# Altium PCB Audio-Player-v1.1.PcbDoc (part 3 of 3)
Units mil, origin at the board's own origin, x right, y up, seen from the top; angles counter-clockwise.
Board outline 4527.56 x 1574.8 mil, 4 copper layers (Top Layer, Ground, Power, Bottom Layer), stack 62.449 mil thick; 107 components, 72 nets, 372 pads, 147 vias.
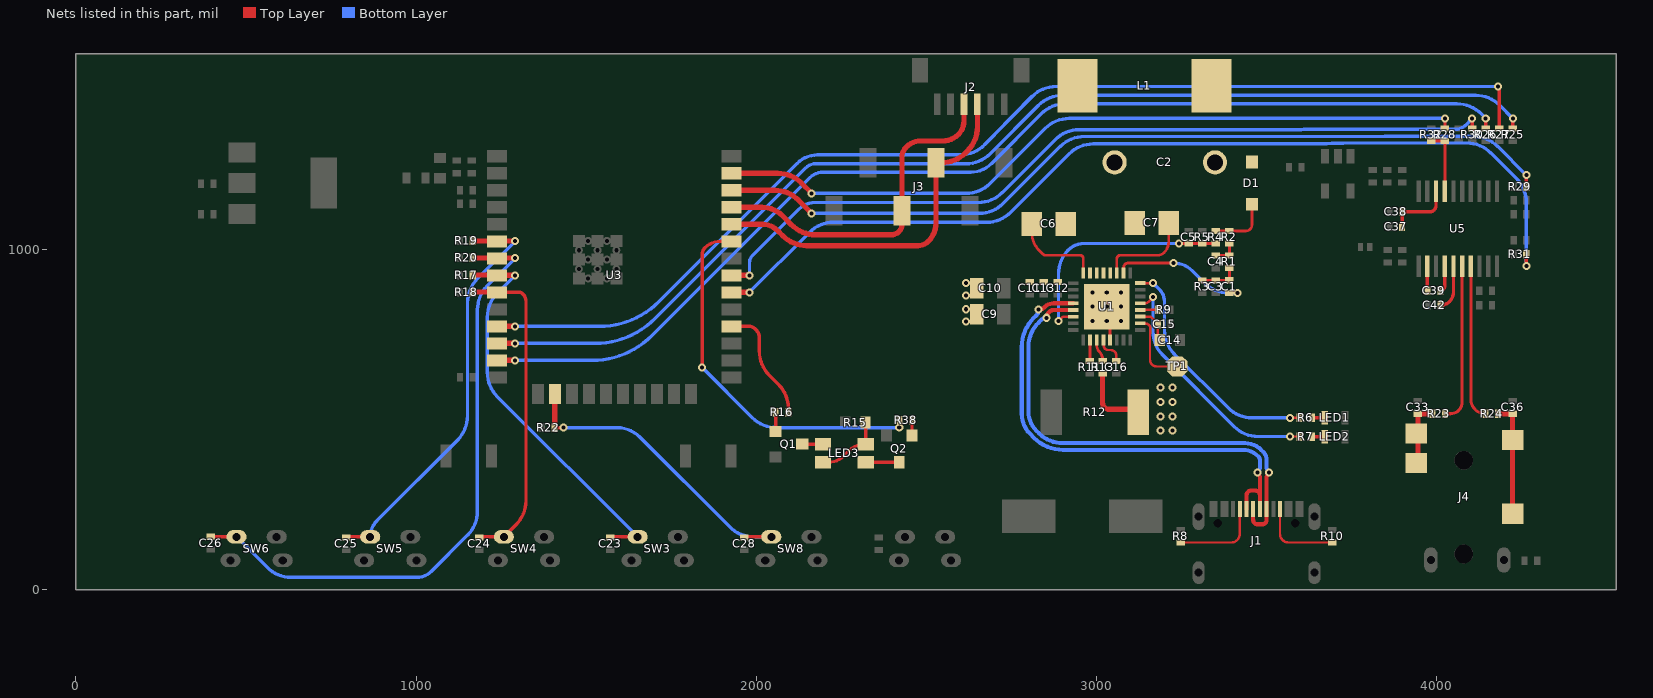
[diagram p4: the nets of this part, all layers, seen from the top]

## Via types
v1: diameter 23.62, hole 11.81, Top Layer to Bottom Layer, tented both sides, 147 vias

## Nets (pads, with @x,y where several pads share a name; then routed paths per layer and width w, separated by ;. In a path a pad name is that pad's centre, name@x,y a point inside that pad or via, vN(x,y) a via of type N, cw(c..) or ccw(c..) an arc to the next point about the centre after c; other vN are vias at no path point) (continued)
IO13: C28.2 R22.1 SW8.1 U3.16 | length 937.3
  Top Layer w10: R22.1@1407.8,478.67 ccw(c1414.24,485.11) 1414.24,476 v1(1434,476) ; C28.2@1965.13,153.5 cw(c1969.14,149.5) 1969.14,155.16 SW8.1@2044.17,155.16
  Top Layer w15.33: R22.1@1407.8,478.67 U3.16@1407.8,574.79
  Bottom Layer w10: v1(1434,476) 1591.41,476 cw(c1591.41,382.83) 1657.29,448.71 1921.55,184.45 ccw(c1992.26,255.16) 1992.26,155.16 SW8.1@2044.17,155.16
IO14: R26.2 U3.13 | length 3240
  Top Layer w10: R26.2@4144.36,1356 v1(4144.36,1385)
  Top Layer w15.33: U3.13@1238.11,674 v1(1291,674)
  Bottom Layer w10: v1(1291,674) 1518.11,674 ccw(c1518.11,920.64) 1692.51,746.24 2156.69,1210.42 cw(c2196.72,1170.38) 2196.72,1227 2630,1227 ccw(c2630,1313.91) 2691.46,1252.46 2837.71,1398.71 cw(c2908.42,1328) 2908.42,1428 4059.94,1428 cw(c4059.94,1328) 4130.65,1398.71 v1(4144.36,1385)
IO17: R16.1 U3.28 | length 347.5
  Top Layer w10: U3.28@1927.09,774 1979.68,774 cw(c1979.68,752.34) 1995,767.66 2000.76,761.9 cw(c1980.86,742) 2009,742 2009,701.29 ccw(c2109,701.29) 2038.29,630.58 2064.71,604.16 cw(c1994,533.45) 2094,533.45 R16.1@2094,521
IO18: R31.2 U3.30 | length 2814.7
  Top Layer w10: v1(4263.55,951) R31.2@4263.55,986.17
  Top Layer w15.33: U3.30@1927.09,874 v1(1979.98,874)
  Bottom Layer w10: v1(1979.98,874) 2156.69,1050.71 cw(c2227.4,980) 2227.4,1080 2677.43,1080 ccw(c2677.43,1180) 2748.14,1109.29 2919.91,1281.05 cw(c2990.32,1210.64) 2990.32,1310.22 3677.57,1310.22 cw(c3697.69,1212.26) 3691.28,1312.06 3725.31,1312.26 3846.94,1313 ccw(c3846.88,1333) 3847.02,1313 4088.58,1313 cw(c4088.58,1213) 4159.29,1283.71 4234.26,1208.74 cw(c4163.55,1138.03) 4263.55,1138.03 v1(4263.55,951)
IO19: R30.2 U3.31 | length 2411.4
  Top Layer w10: R30.2@4104.41,1356 v1(4104.41,1385)
  Top Layer w15.33: U3.31@1927.09,924 v1(1979.98,924)
  Bottom Layer w10: v1(1979.98,924) 1979.98,961.56 cw(c2007.55,961.56) 1988.05,981.05 2125.48,1118.48 cw(c2172.37,1071.6) 2172.37,1137.9 2652.48,1137.9 ccw(c2652.48,1237.9) 2723.19,1167.19 2878.83,1322.83 cw(c2949.54,1252.12) 2949.54,1352.12 3601.97,1352.12 cw(c3615.24,1253) 3615.24,1353 4056.64,1353 ccw(c4056.64,1391.05) 4083.55,1364.14 v1(4104.41,1385)
IO21: R38.1 U3.33 | length 1107.9
  Top Layer w10: v1(1841,653) 1841,985.69 cw(c1868.31,985.69) 1849,1005 cw(c1894.87,959.13) 1894.87,1024 U3.33@1927.09,1024 ; v1(2420.33,476.27) 2420.33,498.35 R38.1@2420.63,498.35
  Bottom Layer w10: v1(1841,653) 1988.44,505.56 ccw(c2059.15,576.27) 2059.15,476.27 v1(2420.33,476.27)
IO22: R29.2 U3.36 | length 2521.5
  Top Layer w10: R29.2@4263.55,1185 v1(4263.55,1218.23)
  Top Layer w15.33: U3.36@1927.09,1174 2053.58,1174 cw(c2053.58,1074) 2124.29,1144.71 v1(2163,1106)
  Bottom Layer w10: v1(2163,1106) 2655.58,1106 ccw(c2655.58,1206) 2726.29,1135.29 2893.81,1302.81 cw(c2964.52,1232.1) 2964.52,1332.1 3697.69,1332.1 3846.88,1333 cw(c3847,1313) 3847,1333 4088.58,1333 cw(c4088.58,1213) 4096.24,1332.76 4107.72,1332.02 ccw(c4108.36,1342) 4108.36,1332 cw(c4108.36,1232) 4179.07,1302.71 v1(4263.55,1218.23)
IO23: R28.2 U3.37 | length 2229.1
  Top Layer w10: R28.2@4024.5,1356 v1(4024.5,1385)
  Top Layer w15.33: U3.37@1927.09,1224 2062.58,1224 cw(c2062.58,1124) 2133.29,1194.71 v1(2163,1165)
  Bottom Layer w10: v1(2163,1165) 2616.99,1165 ccw(c2616.99,1265) 2687.7,1194.29 2849.2,1355.78 cw(c2919.91,1285.07) 2919.91,1385.07 4022.89,1385.07 cw(c4022.89,1366.57) v1@4024.5,1385
IO26: R27.2 U3.11 | length 3337.3
  Top Layer w10: v1(4181,1479) 4184.31,1475.69 R27.2@4184.31,1356
  Top Layer w15.33: U3.11@1238.11,774 v1(1291,774)
  Bottom Layer w10: v1(1291,774) 1539.21,774 ccw(c1539.21,1020.64) 1713.61,846.24 2121.12,1253.76 cw(c2179.65,1195.23) 2179.65,1278 2600.15,1278 ccw(c2600.15,1378) 2622.09,1280.44 ccw(c2600.15,1378) 2670.86,1307.29 2701.48,1337.91 ccw(c2687.29,1352) 2701.6,1338.02 2810.61,1449.61 cw(c2817.76,1442.62) 2810.73,1449.73 cw(c2881.42,1379) 2881.42,1479 v1(4181,1479)
IO27: R25.2 U3.12 | length 3319.8
  Top Layer w10: R25.2@4224.26,1356 v1(4224.26,1385)
  Top Layer w15.33: U3.12@1238.11,724 v1(1291,724)
  Bottom Layer w10: v1(1291,724) 1527.11,724 ccw(c1527.11,970.64) 1701.51,796.24 2144.11,1238.84 cw(c2175.88,1207.06) 2175.88,1252 2616.58,1252 ccw(c2616.58,1352) 2687.29,1281.29 2829.71,1423.71 cw(c2900.42,1353) 2900.42,1453 4114.84,1453 cw(c4114.84,1353) 4185.55,1423.71 v1(4224.26,1385)
IO32: C23.2 R17.1 SW3.1 U3.8 | length 1182.9
  Top Layer w10: C23.2@1570.17,153.5 cw(c1574.17,149.5) 1574.17,155.16 SW3.1@1651.17,155.16
  Top Layer w15.33: R17.1@1166.43,924.5 U3.8@1238.11,924.5 ; U3.8@1238.11,924 v1(1291,924)
  Bottom Layer w10: v1(1291,924) 1238.87,871.87 ccw(c1309.58,801.16) 1209.58,801.16 1209.58,638.17 ccw(c1309.58,638.17) 1238.87,567.46 SW3.1@1651.17,155.16
IO33: C24.2 R18.1 SW4.1 U3.9 | length 957
  Top Layer w10: C24.2@1189.04,155.16 SW4.1@1258.17,155.16 1293.71,190.7 ccw(c1223,261.41) 1323,261.41 1323,847.27 ccw(c1292.27,847.27) 1314,869 ccw(c1300.72,855.72) 1300.72,874.5 U3.9@1238.11,874.5
  Top Layer w15.33: R18.1@1166.43,874.5 U3.9@1238.11,874.5
IO34: C25.2 R19.1 SW5.1 U3.6 | length 1230.4
  Top Layer w10: C25.2@794,153.5 cw(c798,149.5) 798,155.16 SW5.1@865.17,155.16
  Top Layer w15.33: R19.1@1166.43,1024.5 v1(1291,1024.5)
  Bottom Layer w10: SW5.1@865.17,155.16 cw(c932.81,155.16) 884.98,202.98 1121.71,439.71 ccw(c1051,510.42) 1151,510.42 1151,843.08 cw(c1251,843.08) 1180.29,913.79 v1(1291,1024.5)
IO35: C26.2 R20.1 SW6.1 U3.7 | length 1836.8
  Top Layer w10: C26.2@397.07,153.5 cw(c401.07,149.5) 401.07,155.16 SW6.1@472.17,155.16
  Top Layer w15.33: R20.1@1166.43,974.5 v1(1291,974.5)
  Bottom Layer w10: SW6.1@472.17,155.16 562.04,65.29 ccw(c632.75,136) 632.75,36 1001.12,36 ccw(c1001.12,99.87) 1046.25,54.67 ; 1046.28,54.71 1151,159.42 ccw(c1080.29,230.13) 1180.29,230.13 1180.29,822.37 cw(c1280.29,822.37) 1209.58,893.08 v1(1291,974.5)
MUTE: R28.1 R32.2 U5.17 | length 188.1
  Top Layer w10: R32.2@3984.55,1319 R28.1@4024.5,1319 4024.5,1171.47 U5.17@4023.87,1171.47
NetC1_2: C1.2 C3.2 R1.1 R3.2 | length 115.6
  Top Layer w8: R3.2@3311.4,909 3311.4,909.5 C1.2@3391,909.5 R1.1@3391,944.95
NetC2_1: C2.1 D1.1 L1.2
NetC2_2: C2.2 C7.2 U1.20 U1.21
NetC4_2: C4.2 R1.2 R2.1 | length 75.4
  Top Layer w8: C4.2@3351.2,981.8 3351.2,981.95 R1.2@3391,981.95 R2.1@3391,1017.4
NetC6_1: C6.1 U1.24 | length 270.8
  Top Layer w8: C6.1@2809.51,1074.9 2809.51,1052.56 ccw(c2890.91,1052.56) 2833.35,995 2841.1,987.26 ccw(c2851.37,997.53) 2851.37,983 2951.37,983 cw(c2951.37,972.9) 2961.47,972.9 U1.24@2961.47,930.44 ; C6.1@2830.06,1072.46 cw(c2832.51,1072.46) C6.1@2832.51,1074.9
NetC6_2: C6.2 L1.1 U1.22 U1.23
NetC7_1: C7.1 U1.19 | length 280.1
  Top Layer w8: U1.19@3059.9,930.44 3059.9,972.9 cw(c3070,972.9) 3070,983 3180.17,983 ccw(c3180.17,1009.63) 3199,990.8 ccw(c3166.89,1022.91) 3212.3,1022.91 C7.1@3212.3,1077.9
NetC14_1: C14.1 C15.1 U1.11 | length 110.9
  Top Layer w7: U1.11@3128.73,802.57 3154.38,802.57 cw(c3154.38,790.38) 3162.07,799.84 ccw(c3171.5,809.5) 3162.93,799.07 cw(c3154.38,790.38) 3163,799 3179.44,782.56 cw(c3176.88,780) C15.1@3180.5,780 3180.5,739.1 ccw(c3186,739.1) C14.1@3186,733.6
NetC16_2: C16.2 U1.4 | length 85.6
  Top Layer w7: U1.4@3020.41,733.6 3020.41,728.74 ccw(c3049.74,728.74) 3021.09,722.47 3021.09,717.85 ccw(c3034.59,717.85) 3027.93,706.11 ccw(c3034.59,717.85) 3034.59,704.35 3042,704.35 cw(c3042,687.66) 3053.81,699.46 cw(c3043.68,689.34) 3058,689.34 C16.2@3058,672.5
NetC37_2: C37.2 C38.2 U5.18 | length 196.5
  Top Layer w10: C37.2@3898.55,1066.37 C38.2@3898.55,1110.38 3978.99,1110.38 ccw(c3978.99,1129.67) 3998.28,1129.67 U5.18@3998.28,1171.47
NetC39_1: C39.1 U5.2 | length 72.5
  Top Layer w10: U5.2@3972.69,951 3972.69,879.79 ccw(c3973.48,879.79) C39.1@3973.48,879
NetC39_2: C39.2 U5.4 | length 79.6
  Top Layer w10: C39.2@4010.48,879 ccw(c4010.48,892.39) 4023.87,892.39 U5.4@4023.87,951
NetC42_1: C42.1 U5.5 | length 136.7
  Top Layer w10: C42.1@4011.5,836 ccw(c4011.5,873.96) 4049.46,873.96 U5.5@4049.46,951
NetD1_2: D1.2 R2.2 R4.2 | length 176.8
  Top Layer w8: R4.2@3351.2,1054.4 R2.2@3391,1054.4 3439.28,1054.4 ccw(c3439.28,1072.12) 3457,1072.12 D1.2@3457,1132.99
NetJ1_A5: J1.A5 R8.1 | length 261.1
  Top Layer w7: R8.1@3247.68,138.5 3395.83,138.5 ccw(c3395.83,164.09) 3421.42,164.09 J1.A5@3421.42,236.81
NetJ1_B5: J1.B5 R10.1 | length 240.5
  Top Layer w7: J1.B5@3539.53,236.81 3539.53,164.09 ccw(c3565.12,164.09) 3565.12,138.5 R10.1@3692.68,138.5
NetLED1_1: LED1.1 R6.2 | length 38
  Top Layer w10: R6.2@3633.5,505 LED1.1@3671.47,505
NetLED2_1: LED2.1 R7.2 | length 38
  Top Layer w10: R7.2@3633.5,449 LED2.1@3671.47,449
NetLED3_1: LED3.1 LED3.3 R15.2 | length 205.7
  Top Layer w10: LED3.1@2195.92,374.55 2212.93,374.55 ccw(c2212.93,435.61) 2256.1,392.43 2269.78,406.11 cw(c2321.9,353.98) LED3.3@2321.9,427.7 cw(c2323.33,429.13) 2321.31,429.13 R15.2@2321.31,491.02
NetLED3_2: LED3.2 Q1.3 | length 60.4
  Top Layer w10: Q1.3@2135.5,427.7 LED3.2@2195.92,427.7
NetLED3_4: LED3.4 Q2.3 | length 98.4
  Top Layer w10: LED3.4@2321.9,374.55 Q2.3@2420.33,374.55
NetQ1_1: Q1.1 R16.2 | length 56.1
  Top Layer w10: Q1.1@2056.76,465.1 2057,465.1 R16.2@2057,521
NetQ2_1: Q2.1 R38.2 | length 45.1
  Top Layer w10: R38.2@2457.63,498.35 2457.73,498.25 Q2.1@2457.73,453.29
NetR6_1: R6.1 U1.16 | length 711.8
  Top Layer w7: U1.16@3128.73,901 3166.05,901 cw(c3166.05,894) v1@3171,898.95 ; v1(3569,505) R6.1@3596.5,505
  Bottom Layer w10: v1(3166.29,901) 3185.65,881.64 cw(c3151.02,847) 3200,847 3200,762.86 ccw(c3300,762.86) 3229.29,692.14 3387.14,534.29 ccw(c3457.86,605) 3457.86,505 v1(3569,505)
NetR7_1: R7.1 U1.13 | length 721.2
  Top Layer w7: U1.13@3128.73,841.94 3142.04,841.94 ccw(c3142.04,859.62) 3149.43,843.56 ccw(c3144.48,856.12) 3154.54,847.12 3163,855.58 3163,859.62 v1(3166.29,859.62) ; v1(3569,450) 3594.09,450 cw(c3594.09,446.59) R7.1@3596.5,449
  Bottom Layer w10: v1(3166.29,859.62) 3166.29,759.13 ccw(c3266.29,759.13) 3195.58,688.42 3404.71,479.29 ccw(c3475.42,550) 3475.42,450 v1(3569,450)
NetR9_1: R9.1 U1.12 | length 52
  Top Layer w7: U1.12@3128.73,822.26 3180.5,822.26 R9.1@3180.5,822
NetR11_2: R11.2 U1.2 | length 63.9
  Top Layer w8: R11.2@2980,672.5 ccw(c2977.49,675.01) R11.2@2981.04,675.01 ; R11.2@2981.04,672.5 U1.2@2981.04,733.6
NetR13_2: R13.2 U1.3 | length 65.7
  Top Layer w8: U1.3@3000.73,733.6 3000.73,718.97 ccw(c3028.97,718.97) 3009,699 cw(c2987.27,677.27) 3018,677.27 R13.2@3018,672.5
NetR23_1: R23.1 U5.6 | length 470.3
  Top Layer w9: R23.1@4024.14,517 4040.9,517 ccw(c4040.9,551.15) 4075.05,551.15 U5.6@4075.05,951
NetR24_1: R24.1 U5.7 | length 458.3
  Top Layer w9: U5.7@4100.64,951 4100.64,559.5 ccw(c4143.14,559.5) R24.1@4143.14,517
NetTP1_1: TP1.1 U1.10 | length 221
  Top Layer w7: U1.10@3128.73,782.89 3140.2,782.89 cw(c3140.2,768.71) 3144.54,782.21 cw(c3144.48,768.71) 3157.98,768.71 3157.98,754.66 ccw(c3171,751.1) 3157.5,751.1 3157.5,675.38 ccw(c3176.88,675.38) 3176.88,656 TP1.1@3237,656
OUTL: C33.2 J4.4 J4.6 R23.2 | length 190.9
  Top Layer w15.33: J4.4@3939.78,372.53 3944.86,377.61 J4.6@3944.86,459.14 ; J4.6@3939.78,459.14 3945,464.36 C33.2@3945,517 R23.2@3987.14,517
OUTR: C36.2 J4.3 J4.5 R24.2 | length 337.1
  Top Layer w15.33: R24.2@4180.14,517 C36.2@4223.14,517 4223.25,516.89 J4.5@4223.25,439.45 J4.3@4223.24,222.92
PGND: C9.1 C10.1 C11.1 C12.1 C13.1 R12.1 R13.1 U1.5 U1.33 | length 313
  Top Layer w8: v1(3030.31,832.02) cw(c3030.31,822.23) 3040.1,822.23 U1.5@3040.1,733.6
  Top Layer w15.33: R13.1@3018,635.5 3018,548.59 ccw(c3036.59,548.59) 3036.59,530 3116.95,530 cw(c3116.95,522) R12.1@3124.95,522
  other v1: 3187.86,467.52 3223.86,467.52 3187.86,509.52 3223.86,509.52 3187.86,551.52 3223.86,551.52 3187.86,593.52 3223.86,593.52 2616.64,788.2 2988.31,790.02 3030.31,790.02 3072.31,790.02 2616.64,824.2 2988.31,832.02 3072.31,832.02 2616.64,865 2988.31,874.02 3030.31,874.02 3072.31,874.02 2616.64,901
RXD0: J2.4 J3.4 U3.34 | length 1086.8
  Top Layer w15.33: U3.34@1927.09,1074 2018.54,1074 cw(c2018.54,1012.54) 2062,1056 2077.71,1040.29 ccw(c2148.42,1111) 2148.42,1011 2474.62,1011 ccw(c2474.62,1055.38) 2506,1024 ccw(c2452.89,1077.11) 2528,1077.11 J3.4@2528,1255 2544.96,1255 ccw(c2544.96,1355) 2615.67,1284.29 2620.7,1289.32 ccw(c2549.99,1360.03) 2649.99,1360.03 J2.4@2649.99,1427.3
TXD0: J2.3 J3.3 U3.35 | length 1031.4
  Top Layer w15.33: U3.35@1927.09,1124 2016.04,1124 cw(c2016.04,1036.78) 2034.23,1122.08 cw(c2016.04,1036.78) 2077.71,1098.45 2103.88,1072.29 ccw(c2174.59,1143) 2174.59,1043 2396.65,1043 ccw(c2396.65,1075.52) 2419.64,1052.52 ccw(c2399.46,1072.71) 2428,1072.71 J3.3@2428,1113.27 2428,1269.62 cw(c2472.38,1269.62) 2441,1301 cw(c2484.46,1257.54) 2484.46,1319 2548.13,1319 ccw(c2548.13,1383.87) 2594,1338 ccw(c2553.89,1378.11) 2610.62,1378.11 J2.3@2610.62,1427.3
USB_D_N: J1.A7 J1.B7 U1.28 | length 1439.1
  Top Layer w12: v1(2830.06,822.95) ccw(c2830.06,846.88) 2846.98,829.95 2847.62,830.58 cw(c2874.74,803.46) 2874.74,841.82 U1.28@2931.89,841.86 U1.28@2931.89,841.86 ; J1.B7@3441.1,236.81 3441.1,277.37 cw(c3454.88,277.37) 3454.88,291.15 3466.69,291.15 ; 3466.74,291.15 cw(c3466.74,277.37) 3480.52,277.37 ; v1(3473.51,344) cw(c3456.58,327.07) 3480.52,327.07 3480.52,277.37 ; J1.A7@3480.47,236.81 3480.52,277.37
  Bottom Layer w12: v1(2830.06,822.95) 2830.06,822.83 cw(c2806.41,822.83) 2823.13,806.1 2815.39,798.36 ccw(c2899.86,713.89) 2780.4,713.89 2780.4,516.15 ccw(c2862.07,516.15) 2804.24,458.48 ccw(c2862.07,516.15) 2804.32,458.4 2816.73,445.99 ccw(c2901.2,530.46) 2816.82,445.9 ccw(c2901.2,530.46) 2901.2,411 3428.86,411 cw(c3428.86,344.08) 3476.18,391.4 cw(c3465.71,380.93) 3480.52,380.93 3480.52,360.93 cw(c3456.58,360.93) v1(3473.51,344)
USB_D_P: J1.A6 J1.B6 U1.29 | length 1430.6
  Top Layer w12: v1(2853.84,799.17) cw(c2877.78,799.17) 2860.85,816.1 2861.42,816.67 cw(c2874.82,803.26) 2874.82,822.22 2931.85,822.22 U1.29@2931.89,822.18 ; J1.A6@3460.79,236.81 3460.79,204.76 ccw(c3473.44,204.76) 3473.44,192.1 3487.39,192.1 ccw(c3487.39,204.87) 3500.16,204.87 J1.B6@3500.16,236.81 ; J1.B6@3500.12,236.81 3500.12,327.07 cw(c3524.05,327.07) v1(3507.13,344)
  Bottom Layer w12: v1(2853.84,799.17) 2853.72,799.17 ccw(c2853.72,775.51) 2836.99,792.24 2829.29,784.54 ccw(c2900,713.83) 2800,713.83 2800,524.27 ccw(c2881.67,524.27) 2823.92,466.52 2830.55,459.89 ccw(c2901.26,530.6) 2831.37,459.08 ccw(c2901.26,530.6) 2901.26,430.6 3436.98,430.6 cw(c3436.98,363.68) 3484.3,411 3490.5,404.8 cw(c3467.28,381.58) 3500.12,381.58 3500.12,360.93 ccw(c3524.05,360.93) v1(3507.13,344)
V_DECODE: C1.1 U1.18 | length 411.3
  Top Layer w8: U1.18@3079.58,930.44 3079.76,930.75 3079.76,946.19 cw(c3093.76,946.19) 3093.76,960.19 v1(3226.5,960.19) ; C1.1@3391,872.5 v1(3414.16,872.5) cw(c3414.16,871.66) v1@3415,871.66
  Bottom Layer w10: v1(3226.5,960.19) cw(c3226.5,882.18) 3281.55,937.45 cw(c3226.5,882.18) 3281.66,937.34 3317.21,901.79 ccw(c3387.92,972.5) 3387.92,872.5 v1(3414.16,872.5)
V_DET: C5.2 R4.1 R5.2 U1.30 | length 707
  Top Layer w7: v1@2885.62,788.32 ccw(c2885.62,792.3) 2888.43,789.48 2898.12,799.17 cw(c2906.13,791.16) 2906.13,802.49 U1.30@2931.89,802.49
  Top Layer w8: v1(3242,1017.4) C5.2@3271.3,1017.4 R5.2@3311.4,1017.4 R4.1@3351.2,1017.4
  Bottom Layer w10: v1(2888.43,789.49) 2888.43,928.01 cw(c2988.43,928.01) 2917.72,998.72 cw(c2962.81,953.63) 2962.81,1017.4 v1(3242,1017.4)
pads on no net: J1.A8 J1.B8 J1.MH J2.MP1 J2.MP2 J4. J4.2 U1.6 U1.7 U1.8 U1.9 U1.14 U1.15 U1.17 U1.25 U1.31 U3.4 U3.5 U3.10 U3.17 U3.18 U3.19 U3.20 U3.21 U3.22 U3.23 U3.24 U3.26 U3.27 U3.29 U3.32 U4.4

## Polygon pours and split planes (outlines as drawn)
GND on Bottom Layer "GND_L04_P007" (solid, remove dead copper, pour order 7): 0,0 4527.56,0 4527.56,1574.8 0,1574.8
PGND on Bottom Layer "PGND_L04_P004" (solid, pour order 4): 2923,446 3235,446 3235,608 3089,608 3089,902 2923,902
AGND on Bottom Layer "AGND_L04_P000" (solid, remove dead copper, pour order 0): 3801,1291 3801,0 4269,0 4269,905 4269,1291
GND on Ground "GND_L02_P010" (solid, pour order 10): 0,0 4527.56,0 4527.56,1574.8 0,1574.8
PGND on Ground "PGND_L02_P002" (solid, pour order 2): 2598,1000 2598,446 3244,446 3244,1000
AGND on Ground "AGND_L02_P003" (solid, remove dead copper, pour order 3): 3801,1291 3801,0 4269,0 4269,905 4269,1291
GND on Power "GND_L03_P009" (solid, remove dead copper, pour order 9): 0,0 4527.56,0 4527.56,1574.8 0,1574.8
5V on Power "5V_L03_P001" (solid, remove dead copper, pour order 1): 659,1223 659,478 2493,478 2493,1223 3662,1223 3663,1224 3663,9.31 0,9.31 0,1223
AGND on Power "AGND_L03_P006" (solid, remove dead copper, pour order 6): 3801,1291 3801,0 4269,0 4269,905 4269,1291
3V3 on Power "3V3_L03_P005" (solid, pour order 5): 0,1574.8 0,1223 659,1223 659,478 2493,478 2493,1223 2700.5,1223 2700.5,1574.8
GND on Top Layer "GND_L01_P008" (solid, remove dead copper, pour order 8): 0,0 4527.56,0 4527.56,1574.8 0,1574.8

## Other copper
Top Layer:
  region net GND: 3584.81,260.43 3584.81,214.46 3608.43,214.46 3608.43,157 3725.18,157 3725.18,260.43
  region net GND: 3356.46,260.43 3356.46,214.46 3332.84,214.46 3332.84,157 3232.39,157 3232.39,260.43
  region net GND: 1175.43,1252 1175.43,1284 1052.82,1284 1052.82,1252
  region net GND: 2947.64,768.63 2916.14,768.63 2916.14,717.85 2966.92,717.85 2966.92,749.35 2947.64,749.35 2947.64,757.61
  pour cut-out: 3091.46,606 3091.46,455.07 2898.54,455.07 2898.54,606 2961.41,606 2961.41,717.85 3030.5,717.85 3030.5,606
  region net 3V3#: 394,1149 539,1149 539,1094 984.31,1094 984.31,1269.82 539,1269.82 539,1245 394,1245
  region net PGND: 2602,1001 2602,768.63 2687.82,768.63 2687.82,1001
  region net 5V: 2705.82,856.04 2705.82,768.63 2775.2,768.63 2775.2,856.04
  region net PGND: 3244,606 3244,455.07 3091.46,455.07 3091.46,606
  pour cut-out: 831,1574.8 831,1319 2339,1319 2339,1574.8
  region net 5V: 3587.04,1334.06 3587.04,1100.85 3651.25,1100.85 3651.25,1334.06
  region net AGND: 3911.05,1224.97 3785.09,1224.97 3785.09,1310 3911.05,1310
  region net AGND: 4268,132.07 4268,35 4168,35 4168,132.36 4267.74,132.36
  region net PGND: 2898.12,895.5 2791.9,895.5 2791.9,932.67 2602,932.67 2602,1001 2804.4,1001 2804.4,959 2898.12,959 2898.12,913.5
  region net NetC6_2: 3006.14,914.69 3006.14,1559.74 2851.37,1559.74 2851.37,995 2975.65,995 2975.65,914.69 3006.35,914.69
  region net 5V: 528.03,1133.99 528.03,1023 394,1023 394,1133.99
  region net 3V3: 1267.64,1206.28 1138.43,1206.28 1138.43,1161.5 1015.8,1161.5 1015.8,1242.72 1267.64,1242.72
  region net NetC2_1: 3278.8,1559.74 3278.8,1192 3540,1192 3540,1559.74
  region net NetC2_2: 3015.23,914.69 3015.23,1373 3170,1373 3170,995 3045.72,995 3045.72,914.69 3015.02,914.69
  region net 5V: 3553.31,213.19 3553.31,377 3667,377 3667,277.37 3576.93,277.37 3576.93,213.19
  region net 5V: 3387.95,213.19 3387.95,377 3036.74,377 3036.74,166.79 3212,166.79 3212,277.37 3364.33,277.37 3364.33,213.19
  region net 5V: 2947.64,856.04 2705.82,856.04 2705.82,919 2775.2,919 2775.2,887.97 2947.64,887.97
  region net 5V: 3735.07,1252.18 3735.07,1307 3688,1307 3688,1252.18 3688,1215.47 3602.5,1215.47 3602.5,1334.06 3768,1334.06 3768,1252.18 3758.69,1252.18
  region net AGND: 3911.05,1242.97 3721.29,1242.97 3721.29,1295.49 3697.67,1295.49 3697.67,1215.47 3911.05,1215.47
  region net AVDD: 3793,1027.25 3793,921 3953.4,921 3953.4,982.5 3833.04,982.5 3833.04,1027.25
  region net 3V3-CODEC: 3953.4,1139.98 3785.09,1139.98 3785.09,995.73 3697.67,995.73 3697.67,1205.97 3953.4,1205.97
  region net FILTER: 4171.11,1202.97 4171.11,1131.5 4235.55,1131.5 4235.55,1202.97
Ground:
  pour cut-out: 831,1574.8 831,1319 2339,1319 2339,1574.8
Power:
  pour cut-out: 831,1574.8 831,1319 2339,1319 2339,1574.8
Bottom Layer:
  pour cut-out: 831,1574.8 831,1319 2339,1319 2339,1574.8

## Silkscreen, mask and mechanical layers (free items; w line width, h text height)
Top Overlay:
  lines w5: 524.55,819.28 524.55,1025.28 ; 524.81,819.28 626.45,819.28 626.45,1025.28 525.65,1025.28 ; 1104.62,847 1104.62,1053 ; 1104.88,847 1190.39,847 ; 1105.72,1053 1191.22,1053 1191.22,847
  text "1" at 1076.92,1024.44 h50
  text "1" at 499.57,996.72 h50
  text "RESET" at 1079.24,297.79 h60
  text "BOOT" at 1793.94,297.79 h60
  text "STOP" at 423.97,226.27 h60
  text "NEXT" at 817,226.26 h60
  text "PREV" at 1210,226.26 h60
  text "PLAY" at 1603,226.26 h60
  text "VOL-" at 1995.97,226.27 h60
  text "VOL+" at 2389,226.26 h60
Board Outline:
  circle w10: c3640.87,767.66 r208
  circle w10: c2262.92,767.66 r208
  circle w10: c884.97,767.66 r208
  lines w10: 0,0 4527.56,0 4527.56,1574.8 0,1574.8 0,0
Fabrication:
  drawing of 297 lines, arcs and shapes, not listed
  text "Layer" at 5150.09,1284 h60
  text "Name" at 5560,1284 h60
  text "Material" at 6489.74,1284 h60
  text "Thickness" at 7349.51,1284 h60
  text "Constant" at 7999.35,1284 h60
  text "Board Layer Stack" at 8569.21,1284 h60
  text "Top Overlay" at 5560,1164 h60
  text "Top Solder" at 5560,1044 h60
  text "Solder Resist" at 6489.74,1044 h60
  text "0.40mil" at 7349.51,1044 h60
  text "3.5" at 7999.35,1044 h60
  text "1" at 5150.09,924 h60
  text "Top Layer" at 5560,924 h60
  text "1.38mil" at 7349.51,924 h60
  text "Dielectric 2" at 5560,804 h60
  text "PP-006" at 6489.74,804 h60
  text "8.28mil" at 7349.51,804 h60
  text "4.1" at 7999.35,804 h60
  text "2" at 5150.09,684 h60
  text "Ground" at 5560,684 h60
  text "CF-004" at 6489.74,684 h60
  text "0.60mil" at 7349.51,684 h60
  text "Dielectric 1" at 5560,564 h60
  text "FR-4" at 6489.74,564 h60
  text "41.93mil" at 7349.51,564 h60
  text "4.8" at 7999.35,564 h60
  text "3" at 5150.09,444 h60
  text "Power" at 5560,444 h60
  text "CF-004" at 6489.74,444 h60
  text "0.60mil" at 7349.51,444 h60
  text "Dielectric 3" at 5560,324 h60
  text "PP-006" at 6489.74,324 h60
  text "8.28mil" at 7349.51,324 h60
  text "4.1" at 7999.35,324 h60
  text "4" at 5150.09,204 h60
  text "Bottom Layer" at 5560,204 h60
  text "1.38mil" at 7349.51,204 h60
  text "Bottom Solder" at 5560,84 h60
  text "Solder Resist" at 6489.74,84 h60
  text "0.40mil" at 7349.51,84 h60
  text "3.5" at 7999.35,84 h60
  text "Bottom Overlay" at 5560,-36 h60
  text "Total board thickness:" at 5150.09,-156 h60
  text "63.25mil" at 7349.51,-156 h60
Mechanical 4:
  circle w0.25: c4668.43,-267.78 r0.12
  circle w0.5: c1763.78,94.73 r18.11
  circle w0.5: c1370.08,94.73 r18.11
  circle w0.5: c1173.23,94.73 r18.11
  circle w0.5: c1566.93,94.73 r18.11
  circle w0.5: c976.42,94.73 r18.11
  circle w0.5: c779.57,94.73 r18.11
  circle w0.5: c2157.48,94.73 r18.11
  circle w0.5: c1960.63,94.73 r18.11
  circle w0.5: c582.72,94.73 r18.11
  circle w0.5: c385.87,94.73 r18.11
  circle w0.5: c-32.35,-149.67 r45.28
  circle w0.25: c184.18,-43.37 r0.12
  circle w0.25: c-140.62,-269.75 r0.12
  circle w0.25: c0.04,-0.07 r0.12
  circle w0.25: c184.18,-43.37 r0.12
  circle w0.25: c77.88,-267.78 r0.12
  circle w0.25: c77.88,-149.67 r0.12
  circle w0.25: c-140.62,-269.75 r0.12
  circle w0.25: c4447.96,-149.67 r0.12
  circle w0.25: c4447.96,-149.67 r0.12
  circle w0.5: c4558.2,-149.67 r45.28
  circle w0.25: c4527.6,-0.07 r0.12
  circle w0.25: c4512.92,-149.67 r0.12
  circle w0.5: c4558.2,-149.67 r45.28
  circle w0.5: c4558.2,-149.67 r45.28
  circle w0.5: c4558.2,2298.83 r45.28
  circle w0.5: c4558.2,2298.83 r45.28
  circle w0.25: c4527.6,1574.73 r0.12
  circle w0.25: c4512.92,2298.83 r0.12
  circle w0.5: c4079.57,104.73 r27.56
  circle w0.5: c4079.57,380.32 r27.56
  circle w0.5: c3640.87,767.66 r208
  circle w0.25: c0.04,1574.73 r0.12
  circle w0.25: c4666.46,2409.06 r0.12
  circle w0.25: c4666.46,2409.06 r0.12
  circle w0.5: c-32.35,2298.83 r45.28
  circle w0.5: c-32.35,2298.83 r45.28
  circle w0.25: c-142.59,2407.09 r0.12
  circle w0.25: c-77.63,2298.83 r0.12
  circle w0.25: c-140.62,2409.06 r0.12
  circle w0.25: c4449.93,-269.75 r0.12
  circle w0.5: c3584.43,194.61 r12.2
  circle w0.5: c3356.87,194.61 r12.2
  lines w0.5: 3967.97,69.31 ccw(c3979.78,69.31) 3991.59,69.31 ; 3971.32,69.31 3971.32,104.74 cw(c3983.13,104.74) 3994.94,104.74 3994.94,69.31 ; 4182.53,69.3 ccw(c4194.35,69.3) 4206.16,69.3 ; 4185.88,69.3 4185.88,104.74 cw(c4197.7,104.74) 4209.51,104.74 4209.51,69.3 ; 4341.66,-43.37 cw(c4341.66,-149.67) 4447.96,-149.67 ; 4341.66,-43.37 cw(c4341.66,-149.67) 4447.96,-149.67 ; 4341.66,-43.37 184.18,-43.37 ccw(c184.18,-149.67) 77.88,-149.67 77.88,-267.78 cw(c75.91,-267.78) 75.91,-269.75 -140.62,-269.75 cw(c-140.62,-267.78) -142.59,-267.78 -142.59,2407.09 cw(c-140.62,2407.09) -140.62,2409.06 4666.46,2409.06 cw(c4666.46,2407.09) 4668.43,2407.09 4668.43,-267.78 cw(c4666.46,-267.78) 4666.46,-269.75 4449.93,-269.75 cw(c4449.93,-267.78) 4447.96,-267.78 4447.96,-149.67 ; 0.04,-0.07 4527.6,-0.07 4527.6,1574.73 0.04,1574.73 0.04,-0.07 ; 3286.91,33.98 ccw(c3298.72,33.98) 3310.53,33.98 3310.53,65.48 ccw(c3298.72,65.48) 3286.91,65.48 3286.91,33.98 ; 3288.59,192.64 ccw(c3300.4,192.64) 3312.21,192.64 3312.21,235.95 ccw(c3300.4,235.95) 3288.59,235.95 3288.59,192.64 ; 3627.46,33.98 ccw(c3639.27,33.98) 3651.08,33.98 3651.08,65.48 ccw(c3639.27,65.48) 3627.46,65.48 3627.46,33.98 ; 3629.14,192.64 ccw(c3640.95,192.64) 3652.76,192.64 3652.76,235.95 ccw(c3640.95,235.95) 3629.14,235.95 3629.14,192.64
Drill Drawing:
  circle w10: c5172.62,2974.28 r33.33
  circle w10: c5172.62,2374.28 r20
  circle w10: c5172.62,2374.28 r33.33
  lines w10: 5139.29,1757.61 5155.96,1757.61 5155.96,1740.94 5189.29,1740.94 5189.29,1757.61 5205.96,1757.61 5205.96,1790.94 5189.29,1790.94 5189.29,1807.61 5155.96,1807.61 5155.96,1790.94 5139.29,1790.94 5139.29,1757.61 ; 5139.29,1890.94 5205.96,1890.94 5205.96,1957.61 5139.29,1957.61 5139.29,1890.94 ; 5139.29,2040.94 5172.62,2057.61 5205.96,2040.94 5189.29,2074.28 5205.96,2107.61 5172.62,2090.94 5139.29,2107.61 5155.96,2074.28 5139.29,2040.94 ; 5139.29,2190.94 5139.29,2207.61 5155.96,2224.28 5139.29,2240.94 5139.29,2257.61 5155.96,2257.61 5172.62,2240.94 5189.29,2257.61 5205.96,2257.61 5205.96,2240.94 5189.29,2224.28 5205.96,2207.61 5205.96,2190.94 5189.29,2190.94 5172.62,2207.61 5155.96,2190.94 5139.29,2190.94 ; 5139.29,2507.61 5155.96,2507.61 5172.62,2490.94 5189.29,2507.61 5205.96,2507.61 5189.29,2524.28 5205.96,2540.94 5189.29,2540.94 5172.62,2557.61 5155.96,2540.94 5139.29,2540.94 5155.96,2524.28 5139.29,2507.61 ; 5139.29,2707.61 5205.96,2707.61 5172.62,2640.94 5139.29,2707.61 ; 5139.29,2824.28 5172.62,2790.94 5205.96,2824.28 5172.62,2857.61 5139.29,2824.28
  lines w15: 5079.5,1695.94 19707.33,1695.94 ; 5079.5,3045.94 19707.33,3045.94 ; 5630.38,1545.94 5630.38,3195.94 ; 6220.22,1545.94 6220.22,3195.94 ; 7319.9,1545.94 7319.9,3195.94 ; 7825.78,1545.94 7825.78,3195.94 ; 8559.58,1545.94 8559.58,3195.94 ; 10059.13,1545.94 10059.13,3195.94 ; 10648.98,1545.94 10648.98,3195.94 ; 11394.78,1545.94 11394.78,3195.94 ; 13684.07,1545.94 13684.07,3195.94 ; 14537.83,1545.94 14537.83,3195.94 ; 15871.44,1545.94 15871.44,3195.94 ; 17205.05,1545.94 17205.05,3195.94 ; 18304.73,1545.94 18304.73,3195.94 ; 5079.5,1545.94 19707.33,1545.94 19707.33,3195.94 5079.5,3195.94 5079.5,1545.94
  text "Symbol" at 5169.5,3090.94 h72
  text "Count" at 5675.38,3090.94 h72
  text "Hole Size" at 6265.22,3090.94 h72
  text "Plated" at 7364.9,3090.94 h72
  text "Hole Type" at 7870.78,3090.94 h72
  text "Drill Layer Pair" at 8604.58,3090.94 h72
  text "Via/Pad" at 10104.13,3090.94 h72
  text "Pad Shape" at 10693.98,3090.94 h72
  text "Template" at 11439.78,3090.94 h72
  text "Description" at 13729.07,3090.94 h72
  text "Hole Tolerance (+)" at 14582.83,3090.94 h72
  text "Hole Tolerance (-)" at 15916.44,3090.94 h72
  text "Hole Length" at 17250.05,3090.94 h72
  text "Routed Path Length" at 18349.73,3090.94 h72
  text "2" at 5675.38,2940.94 h60
  text "23.62mil (0.600mm)" at 6265.22,2940.94 h60
  text "PTH" at 7364.9,2940.94 h60
  text "Slot" at 7870.78,2940.94 h60
  text "Top Layer - Bottom Layer" at 8604.58,2940.94 h60
  text "Pad" at 10104.13,2940.94 h60
  text "Rounded" at 10693.98,2940.94 h60
  text "r90_170h60_140r100" at 11439.78,2940.94 h60
  text "55.12mil (1.400mm)" at 17250.05,2940.94 h60
  text "31.50mil (0.800mm)" at 18349.73,2940.94 h60
  text "2" at 5675.38,2790.94 h60
  text "23.62mil (0.600mm)" at 6265.22,2790.94 h60
  text "PTH" at 7364.9,2790.94 h60
  text "Slot" at 7870.78,2790.94 h60
  text "Top Layer - Bottom Layer" at 8604.58,2790.94 h60
  text "Pad" at 10104.13,2790.94 h60
  text "Rounded" at 10693.98,2790.94 h60
  text "r100_190h60_150r100m105_195mx105_195p0" at 11439.78,2790.94 h60
  text "59.06mil (1.500mm)" at 17250.05,2790.94 h60
  text "35.43mil (0.900mm)" at 18349.73,2790.94 h60
  text "2" at 5675.38,2640.94 h60
  text "23.62mil (0.600mm)" at 6265.22,2640.94 h60
  text "PTH" at 7364.9,2640.94 h60
  text "Slot" at 7870.78,2640.94 h60
  text "Top Layer - Bottom Layer" at 8604.58,2640.94 h60
  text "Pad" at 10104.13,2640.94 h60
  text "Rounded" at 10693.98,2640.94 h60
  text "(Mixed)" at 11439.78,2640.94 h60
  text "66.93mil (1.700mm)" at 17250.05,2640.94 h60
  text "43.31mil (1.100mm)" at 18349.73,2640.94 h60
  text "2" at 5675.38,2490.94 h60
  text "24.41mil (0.620mm)" at 6265.22,2490.94 h60
  text "NPTH" at 7364.9,2490.94 h60
  text "Round" at 7870.78,2490.94 h60
  text "Top Layer - Bottom Layer" at 8604.58,2490.94 h60
  text "Pad" at 10104.13,2490.94 h60
  text "Rounded" at 10693.98,2490.94 h60
  text "c0hn62" at 11439.78,2490.94 h60
  text "-" at 17250.05,2490.94 h60
  text "-" at 18349.73,2490.94 h60
  text "2" at 5675.38,2340.94 h60
  text "47.24mil (1.200mm)" at 6265.22,2340.94 h60
  text "PTH" at 7364.9,2340.94 h60
  text "Round" at 7870.78,2340.94 h60
  text "Top Layer - Bottom Layer" at 8604.58,2340.94 h60
  text "Pad" at 10104.13,2340.94 h60
  text "Rounded" at 10693.98,2340.94 h60
  text "c180h120m185mx185p0" at 11439.78,2340.94 h60
  text "-" at 17250.05,2340.94 h60
  text "-" at 18349.73,2340.94 h60
  text "2" at 5675.38,2190.94 h60
  text "55.12mil (1.400mm)" at 6265.22,2190.94 h60
  text "NPTH" at 7364.9,2190.94 h60
  text "Round" at 7870.78,2190.94 h60
  text "Top Layer - Bottom Layer" at 8604.58,2190.94 h60
  text "Pad" at 10104.13,2190.94 h60
  text "Rounded" at 10693.98,2190.94 h60
  text "c140hn140p0" at 11439.78,2190.94 h60
  text "-" at 17250.05,2190.94 h60
  text "-" at 18349.73,2190.94 h60
  text "6" at 5675.38,2040.94 h60
  text "23.62mil (0.600mm)" at 6265.22,2040.94 h60
  text "PTH" at 7364.9,2040.94 h60
  text "Slot" at 7870.78,2040.94 h60
  text "Top Layer - Bottom Layer" at 8604.58,2040.94 h60
  text "Pad" at 10104.13,2040.94 h60
  text "Rounded" at 10693.98,2040.94 h60
  text "r150_100h60_90r100" at 11439.78,2040.94 h60
  text "35.43mil (0.900mm)" at 17250.05,2040.94 h60
  text "11.81mil (0.300mm)" at 18349.73,2040.94 h60
  text "18" at 5675.38,1890.94 h60
  text "23.62mil (0.600mm)" at 6265.22,1890.94 h60
  text "PTH" at 7364.9,1890.94 h60
  text "Slot" at 7870.78,1890.94 h60
  text "Top Layer - Bottom Layer" at 8604.58,1890.94 h60
  text "Pad" at 10104.13,1890.94 h60
  text "Rounded" at 10693.98,1890.94 h60
  text "(Mixed)" at 11439.78,1890.94 h60
  text "35.43mil (0.900mm)" at 17250.05,1890.94 h60
  text "11.81mil (0.300mm)" at 18349.73,1890.94 h60
  text "159" at 5675.38,1740.94 h60
  text "11.81mil (0.300mm)" at 6265.22,1740.94 h60
  text "PTH" at 7364.9,1740.94 h60
  text "Round" at 7870.78,1740.94 h60
  text "Top Layer - Bottom Layer" at 8604.58,1740.94 h60
  text "(Mixed)" at 10104.13,1740.94 h60
  text "Rounded" at 10693.98,1740.94 h60
  text "(Mixed)" at 11439.78,1740.94 h60
  text "-" at 17250.05,1740.94 h60
  text "-" at 18349.73,1740.94 h60
  text "195 Total" at 5675.38,1590.94 h60
  text "Slot definitions :" at 5169.5,1445.97 h60
  text "Routed Path Length" at 6202.19,1445.97 h60
  text "= Calculated from tool start centre position to tool end centre position." at 7304.86,1445.97 h60
  text "Hole Length" at 6202.19,1345.99 h60
  text "= Routed Path Length + Tool Size = Slot length as defined in the PCB layout" at 6894.99,1345.99 h60

## Dimensions
0,1574.8 to 0,0 on Fabrication
0,1574.8 to 4527.56,1574.8 on Fabrication

## Text inside footprints (layer, text, board x,y; h text height)
J1: Mechanical 13 "PCB Edge" at 3423.95,31.98 h20